# Altium PCB slave.PcbDoc (part 6 of 7)
Units mil, origin at the board's own origin, x right, y up, seen from the top; angles counter-clockwise.
Board outline 6299.21 x 3937.01 mil, 6 copper layers (Top Copper, FUSED_VBAT-, Signal Layer 2, Signal Layer 3, VREG, Bot Copper), stack 65.355 mil thick; 495 components, 307 nets, 1435 pads, 1866 vias.
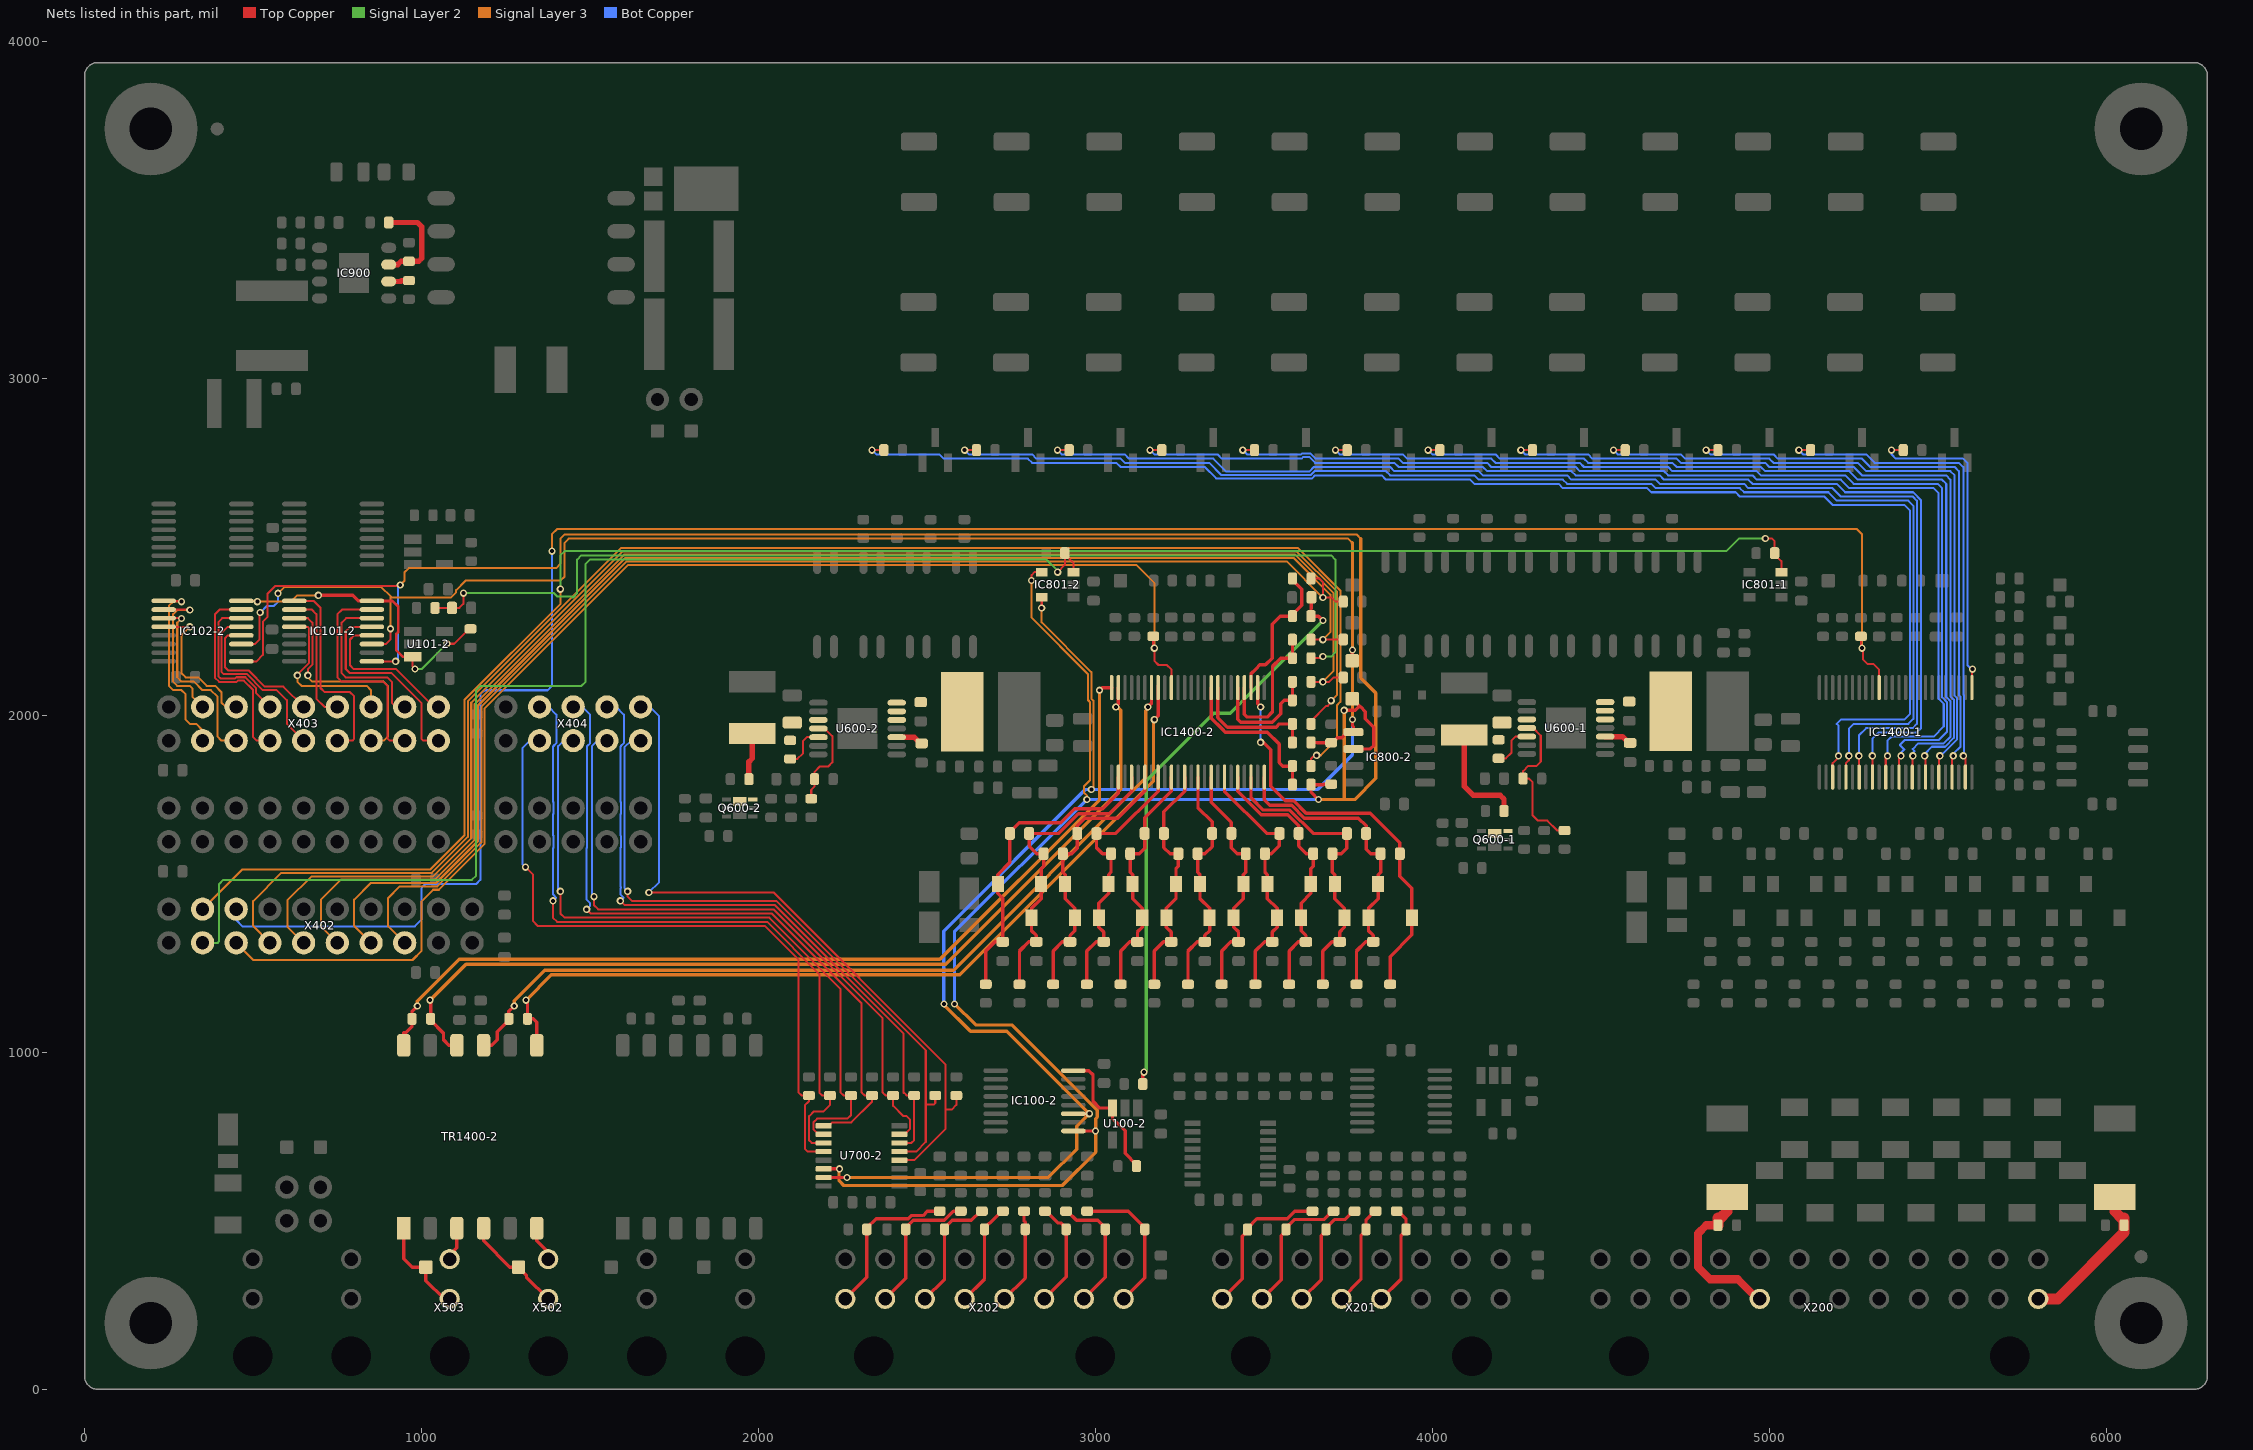
[diagram p9: the nets of this part, all layers, seen from the top]

## Via types
v1: diameter 21.65, hole 11.81, Top Copper to Bot Copper, tented both sides, 1848 vias
v2: diameter 35.43, hole 23.62, Top Copper to Bot Copper, 15 vias
v3: diameter 29.53, hole 19.68, Top Copper to Bot Copper, tented both sides, 3 vias

## Nets (pads, with @x,y where several pads share a name; then routed paths per layer and width w, separated by ;. In a path a pad name is that pad's centre, name@x,y a point inside that pad or via, vN(x,y) a via of type N, cw(c..) or ccw(c..) an arc to the next point about the centre after c; other vN are vias at no path point) (continued)
PRIMARY-T-SENSOR_3: R102-1.1 R111-1.2 X201.4 | length 304.4
  Top Copper w10: X201.4@3847.86,268.43 3906.25,326.82 3906.25,456 3921.31,471.06 R102-1.1@3921.31,475 3921.31,505.07 3897.69,528.69 R111-1.2@3893.75,528.69
PRIMARY-T-SENSOR_4: R105-1.1 R112-1.2 X201.5 | length 304.6
  Top Copper w10: X201.5@3729.82,268.43 3787.5,326.11 3787.5,456 3802.56,471.06 R105-1.1@3802.56,475 3802.56,503.94 3827.31,528.69 R112-1.2@3831.25,528.69
PRIMARY-T-SENSOR_5: R101-1.1 R113-1.2 X201.6 | length 345.9
  Top Copper w10: X201.6@3611.83,268.43 3669.22,325.82 3669.22,456.47 3683.81,471.06 R101-1.1@3683.81,475 3683.81,478.94 3708.81,503.94 3740.06,503.94 3764.81,528.69 R113-1.2@3768.75,528.69
PRIMARY-T-SENSOR_6: R104-1.1 R114-1.2 X201.7 | length 401.8
  Top Copper w10: X201.7@3493.84,268.43 3550.47,325.06 3550.47,456.47 3565.06,471.06 R104-1.1@3565.06,475 3565.06,478.94 3590.06,503.94 3677.56,503.94 3702.31,528.69 R114-1.2@3706.25,528.69
PRIMARY-T-SENSOR_7: R100-1.1 R115-1.2 X201.8 | length 454.6
  Top Copper w10: X201.8@3375.85,268.43 3434.97,327.55 3434.97,454.43 3450.91,470.37 R100-1.1@3450.91,474.31 3450.91,478.25 3478.91,506.25 3568.75,506.25 3591.19,528.69 R115-1.2@3643.75,528.69
PRIMARY-TEMP-ALERT: IC801-1.3 R801-1.1 X402.17 | length 5543.9
  Top Copper w6: v1(4987.5,2525) 5006.25,2525 5015.06,2516.19 R801-1.1@5015.06,2481.25 5015.06,2477.31 5034.74,2457.63 IC801-1.3@5034.74,2424.9
  Signal Layer 2 w6: v1(1411.71,2374.51) 1411.71,2474.51 1424.21,2487.01 4872.01,2487.01 4910,2525 v1(4987.5,2525)
  Signal Layer 3 w6: X402.17@350,1425 467.52,1542.52 1026.13,1542.52 1127.38,1643.77 1127.38,2045.85 1411.71,2330.18 v1(1411.71,2374.51)
PRIMARY-WDT: IC1400-1.39 R1401-1.1 X402.15 | length 6522.4
  Top Copper w6: R1401-1.1@5271.09,2234.45 5271.09,2202.63 v1(5274.21,2199.51) 5277.38,2196.34 5277.38,2165.47 5290.17,2152.68 5307.31,2152.68 5325,2135 IC1400-1.39@5325,2082.38
  Signal Layer 3 w6: v1(1386.71,2487.01) 1386.71,2537.01 1402.78,2553.08 5258.14,2553.08 5274.21,2537.01 v1(5274.21,2199.51)
  Bot Copper w6: X402.15@450,1425 449.21,1393.26 468.47,1374 979.95,1374 999.21,1393.26 999.21,1487.01 1011.71,1499.51 1161.71,1499.51 1174.21,1512.01 1174.21,2062.01 1186.71,2074.51 1374.21,2074.51 1386.71,2087.01 v1(1386.71,2487.01)
R_FB: IC900.6 R902.1 | length 61.1
  Top Copper w16: IC900.6@902.42,3287.5 938.22,3287.5 940.78,3290.06 R902.1@962.5,3290.06
R_REF: IC900.7 R903.2 R904.2 | length 302
  Top Copper w16: IC900.7@902.42,3337.5 928.92,3337.5 938.86,3347.44 R903.2@962.5,3347.44 991.63,3347.44 1000,3355.81 1000,3450 987.5,3462.5 R904.2@902.56,3462.5
RON_0: R603-1.1 U600-1.5 | length 132.1
  Top Copper w6: R603-1.1@4195.98,1872.41 4217.69,1872.41 4233.48,1888.19 4233.48,1924.97 4245.39,1936.88 U600-1.5@4279.83,1936.88
RON_1: R603-2.1 U600-2.5 | length 132.1
  Top Copper w6: R603-2.1@2093.65,1870.67 2115.37,1870.67 2131.15,1886.45 2131.15,1923.23 2143.06,1935.14 U600-2.5@2177.51,1935.14
S1: IC1400-1.25 R1530.2 | length 957
  Top Copper w6: v1(5361.71,2787.01) R1530.2@5394.69,2787.01 ; IC1400-1.25@5600.59,2082.38 5600.59,2135.26 v1(5602.34,2137.01)
  Bot Copper w6: v1(5361.71,2787.01) 5361.71,2774.51 5374.21,2762.01 5574.21,2762.01 5586.71,2749.51 5586.71,2149.51 5599.21,2137.01 v1(5602.34,2137.01)
S2: IC1400-1.23 R1525.2 | length 1465.9
  Top Copper w6: v1(5086.71,2787.01) R1525.2@5119.69,2787.01 ; v1(5575,1880) 5580.9,1874.1 IC1400-1.23@5580.9,1816.64
  Bot Copper w6: v1(5086.71,2787.01) 5099.21,2774.51 5286.71,2774.51 5311.71,2749.51 5561.71,2749.51 5575,2736.22 5575,2060.72 5576.83,2058.89 5576.83,1881.83 v1(5575,1880)
S3: IC1400-1.21 R1519.2 | length 1729.3
  Top Copper w6: v1(4811.71,2787.01) R1519.2@4844.69,2787.01 ; IC1400-1.21@5541.53,1816.64 5541.53,1876.53 v1(5545,1880)
  Bot Copper w6: v1(4811.71,2787.01) 4824.21,2774.51 5011.71,2774.51 5024.21,2762.01 5274.21,2762.01 5299.21,2737.01 5549.21,2737.01 5561.71,2724.51 5561.71,2059.87 5566.83,2054.75 5566.83,1907.69 5545,1885.87 v1(5545,1880)
S4: IC1400-1.19 R1513.2 | length 1999.6
  Top Copper w6: v1(4536.71,2787.01) R1513.2@4569.69,2787.01 ; IC1400-1.19@5502.16,1816.64 5502.16,1877.16 v1(5505,1880)
  Bot Copper w6: v1(4536.71,2787.01) 4549.21,2774.51 4736.71,2774.51 4749.21,2762.01 4999.21,2762.01 5011.71,2749.51 5261.71,2749.51 5286.71,2724.51 5536.71,2724.51 5549.21,2712.01 5549.21,2058.23 5556.83,2050.61 5556.83,1928.84 5514.99,1887.01 5511.71,1887.01 5505,1880.3 v1(5505,1880)
S5: IC1400-1.17 R1507.2 | length 2291.3
  Top Copper w6: v1(4261.71,2787.01) R1507.2@4294.69,2787.01 ; v1(5460,1880) 5462.79,1877.21 IC1400-1.17@5462.79,1816.64
  Bot Copper w6: v1(4261.71,2787.01) 4274.21,2774.51 4461.71,2774.51 4474.21,2762.01 4724.21,2762.01 4736.71,2749.51 4986.71,2749.51 4999.21,2737.01 5249.21,2737.01 5274.21,2712.01 5524.21,2712.01 5536.71,2699.51 5536.71,2056.58 5546.83,2046.47 5546.83,1932.98 5520.67,1906.83 5481.53,1906.83 5460,1885.3 v1(5460,1880)
S6: IC1400-1.15 R1501.2 | length 2583.2
  Top Copper w6: v1(3986.71,2787.01) R1501.2@4019.69,2787.01 ; IC1400-1.15@5423.42,1816.64 5423.42,1878.42 v1(5425,1880)
  Bot Copper w6: v1(3986.71,2787.01) 3999.21,2774.51 4186.71,2774.51 4199.21,2762.01 4449.21,2762.01 4461.71,2749.51 4711.71,2749.51 4724.21,2737.01 4974.21,2737.01 4986.71,2724.51 5236.71,2724.51 5261.71,2699.51 5511.71,2699.51 5524.21,2687.01 5524.21,2054.94 5536.83,2042.33 5536.83,1937.13 5516.53,1916.83 5441.53,1916.83 5424.21,1899.51 5430,1893.72 5425,1888.72 v1(5425,1880)
S7: IC1400-1.13 R1531.2 | length 2872.4
  Top Copper w6: v1(3711.71,2787.01) R1531.2@3744.69,2787.01 ; IC1400-1.13@5384.05,1816.64 5384.05,1874.05 v1(5390,1880)
  Bot Copper w6: v1(3711.71,2787.01) 3724.21,2774.51 3911.71,2774.51 3924.21,2762.01 4174.21,2762.01 4186.71,2749.51 4436.71,2749.51 4449.21,2737.01 4699.21,2737.01 4711.71,2724.51 4961.71,2724.51 4974.21,2712.01 5224.21,2712.01 5249.21,2687.01 5499.21,2687.01 5511.83,2674.39 5511.83,2053.18 5526.83,2038.18 5526.83,1952.13 5501.53,1926.83 5401.53,1926.83 5386.71,1912.01 5400,1898.72 5390,1888.72 v1(5390,1880)
S8: IC1400-1.11 R1524.2 | length 3147
  Top Copper w6: v1(3436.71,2787.01) R1524.2@3469.69,2787.01 ; IC1400-1.11@5344.68,1816.64 5344.68,1874.68 v1(5350,1880)
  Bot Copper w6: v1(3436.71,2787.01) 3449.21,2774.51 3609.5,2774.51 3611.82,2776.83 3638.18,2776.83 3653,2762.01 3899.21,2762.01 3911.71,2749.51 4161.71,2749.51 4174.21,2737.01 4424.21,2737.01 4436.71,2724.51 4686.71,2724.51 4699.21,2712.01 4949.21,2712.01 4961.71,2699.51 5211.71,2699.51 5236.71,2674.51 5486.71,2674.51 5501.83,2659.39 5501.83,2049.04 5516.83,2034.04 5516.83,1967.13 5486.71,1937.01 5361.71,1937.01 5349.21,1924.51 5350,1923.72 v1(5350,1880)
S9: IC1400-1.9 R1518.2 | length 3333.7
  Top Copper w6: v1(3161.71,2787.01) R1518.2@3194.69,2787.01 ; v1(5305,1880) 5305.31,1879.69 IC1400-1.9@5305.31,1816.64
  Bot Copper w6: v1(3161.71,2787.01) 3174.21,2774.51 3361.71,2774.51 3374.21,2762.01 3611.14,2762.01 3615.96,2766.83 3634.04,2766.83 3651.36,2749.51 3886.71,2749.51 3899.21,2737.01 4149.21,2737.01 4161.71,2724.51 4411.71,2724.51 4424.21,2712.01 4674.21,2712.01 4686.71,2699.51 4936.71,2699.51 4949.21,2687.01 5199.21,2687.01 5224.21,2662.01 5425.85,2662.01 5449.21,2638.65 5449.21,1962.01 5436.71,1949.51 5324.21,1949.51 5305,1930.3 v1(5305,1880)
S10: IC1400-1.7 R1512.2 | length 3629.1
  Top Copper w6: v1(2886.71,2787.01) R1512.2@2919.69,2787.01 ; v1(5265,1880) 5265.94,1879.06 IC1400-1.7@5265.94,1816.64
  Bot Copper w6: v1(2886.71,2787.01) 2899.21,2774.51 3086.71,2774.51 3099.21,2762.01 3349.21,2762.01 3388.05,2723.17 3634.04,2723.17 3647.88,2737.01 3874.21,2737.01 3886.71,2724.51 4136.71,2724.51 4149.21,2712.01 4399.21,2712.01 4411.71,2699.51 4661.71,2699.51 4674.21,2687.01 4924.21,2687.01 4936.71,2674.51 5186.71,2674.51 5211.71,2649.51 5424.21,2649.51 5436.83,2636.89 5436.83,1974.63 5424.21,1962.01 5286.71,1962.01 5265,1940.3 v1(5265,1880)
S11: IC1400-1.5 R1506.2 | length 3909.3
  Top Copper w6: v1(2611.71,2787.01) R1506.2@2644.69,2787.01 ; IC1400-1.5@5226.57,1816.64 5226.57,1858.04 5235,1866.47 v1(5235,1880)
  Bot Copper w6: v1(2611.71,2787.01) 2624.21,2774.51 2811.71,2774.51 2824.21,2762.01 3074.21,2762.01 3086.71,2749.51 3336.71,2749.51 3373.05,2713.17 3638.18,2713.17 3649.52,2724.51 3861.71,2724.51 3874.21,2712.01 4124.21,2712.01 4136.71,2699.51 4386.71,2699.51 4399.21,2687.01 4649.21,2687.01 4661.71,2674.51 4911.71,2674.51 4924.21,2662.01 5174.21,2662.01 5199.21,2637.01 5411.71,2637.01 5426.83,2621.89 5426.83,1989.63 5411.71,1974.51 5249.21,1974.51 5235,1960.3 v1(5235,1880)
S12: IC1400-1.3 R1500.2 | length 4194.8
  Top Copper w6: v1(2336.71,2787.01) R1500.2@2369.69,2787.01 ; IC1400-1.3@5187.2,1816.64 5187.2,1858.04 5204.73,1875.57 v1(5204.73,1880)
  Bot Copper w6: v1(2336.71,2787.01) 2349.21,2774.51 2536.71,2774.51 2549.21,2762.01 2799.21,2762.01 2811.71,2749.51 3061.71,2749.51 3074.21,2737.01 3324.21,2737.01 3358.05,2703.17 3642.33,2703.17 3651.16,2712.01 3849.21,2712.01 3861.71,2699.51 4111.71,2699.51 4124.21,2687.01 4374.21,2687.01 4386.71,2674.51 4636.71,2674.51 4649.21,2662.01 4899.21,2662.01 4911.71,2649.51 5161.71,2649.51 5186.71,2624.51 5399.21,2624.51 5416.83,2606.89 5416.83,2004.63 5399.21,1987.01 5211.71,1987.01 5199.21,1974.51 5204.73,1968.99 v1(5204.73,1880)
SECONDARY-ANALOG-IN_0: IC101-2.4 X403.1 | length 460.2
  Top Copper w6: IC101-2.4@852.66,2237.2 799.7,2237.2 787.5,2225 787.5,2148.72 799.21,2137.01 924.21,2137.01 1036.22,2025 X403.1@1049.99,2025
SECONDARY-ANALOG-IN_1: IC101-2.5 X403.2 | length 620.7
  Top Copper w6: IC101-2.5@852.66,2262.8 787.8,2262.8 775,2250 775,2137.5 787.5,2125 911.22,2125 999.21,2037.01 999.21,1930.79 1005,1925 X403.2@1049.99,1925
SECONDARY-ANALOG-IN_2: IC101-2.6 X403.3 | length 511.2
  Top Copper w6: IC101-2.6@852.66,2288.39 775.89,2288.39 762.5,2275 762.5,2125 775,2112.5 898.72,2112.5 911.71,2099.51 911.71,2037.01 923.72,2025 X403.3@950,2025
SECONDARY-ANALOG-IN_3: IC101-2.7 X403.4 | length 664
  Top Copper w6: IC101-2.7@851.5,2314 764,2314 750,2300 750,2112.5 762.5,2100 886.22,2100 899.21,2087.01 899.21,1930.79 905,1925 X403.4@950,1925
SECONDARY-ANALOG-IN_4: IC101-2.12 X403.5 | length 497.4
  Top Copper w6: IC101-2.12@622.34,2262.8 662.76,2262.8 665.76,2259.8 665.76,2154.68 631.25,2120.17 v1(631.25,2118.75)
  Signal Layer 3 w6: v1(631.25,2118.75) 631.25,2100 643.75,2087.5 836.71,2087.5 850,2074.21 X403.5@850,2025
SECONDARY-ANALOG-IN_5: IC101-2.11 X403.6 | length 680.5
  Top Copper w6: IC101-2.11@622.34,2288.39 662.76,2288.39 675.76,2275.39 675.76,2150.54 662.5,2137.28 v1(662.5,2118.75)
  Signal Layer 3 w6: v1(662.5,2118.75) 662.5,2112.5 675,2100 887.5,2100 900,2087.5 900,1937.01 887.99,1925 X403.6@850,1925
SECONDARY-ANALOG-IN_6: IC101-2.10 X403.7 | length 392.9
  Top Copper w6: IC101-2.10@623.5,2314 673.5,2314 687.5,2300 687.5,2049.51 712.01,2025 X403.7@750,2025
SECONDARY-ANALOG-IN_7: IC101-2.9 X403.8 | length 612.5
  Top Copper w6: IC101-2.9@622.34,2339.57 679.18,2339.57 700,2318.75 700,2081.25 712.5,2068.75 787.5,2068.75 800,2056.25 800,1930 795,1925 X403.8@750,1925
SECONDARY-ANALOG-IN_8: IC102-2.4 X403.9 | length 419.9
  Top Copper w6: IC102-2.4@465.16,2237.2 424.74,2237.2 416.71,2229.17 416.71,2143.29 426.92,2133.08 486.92,2133.08 535,2085 590,2085 X403.9@650,2025
SECONDARY-ANALOG-IN_9: IC102-2.5 X403.10 | length 550.9
  Top Copper w6: IC102-2.5@465.16,2262.8 424.74,2262.8 406.71,2244.77 406.71,2128.29 411.92,2123.08 481.08,2123.08 529.15,2075 570,2075 600,2045 600,1975 X403.10@650,1925
SECONDARY-ANALOG-IN_10: IC102-2.6 X403.11 | length 436.6
  Top Copper w6: IC102-2.6@465.16,2288.39 408.39,2288.39 396.71,2276.71 396.71,2116.15 403.35,2109.51 447,2109.51 450.57,2113.08 476.93,2113.08 509.21,2080.8 509.21,2065.79 X403.11@550,2025
SECONDARY-ANALOG-IN_11: IC102-2.7 X403.12 | length 596.1
  Top Copper w6: IC102-2.7@464,2314 401.5,2314 386.71,2299.21 386.71,2112.01 399.21,2099.51 451.14,2099.51 454.71,2103.08 472.79,2103.08 499.21,2076.66 499.21,1937.01 511.22,1925 X403.12@550,1925
SECONDARY-ANALOG-IN_12: IC102-2.12 X403.13 | length 447.9
  Top Copper w6: IC102-2.12@234.84,2262.8 312.2,2262.8 v1(312.5,2262.5)
  Signal Layer 3 w6: v1(312.5,2262.5) 287.5,2237.5 287.5,2125 300,2112.5 337.5,2112.5 362.5,2087.5 387.5,2087.5 406.25,2068.75 406.25,2037.5 418.75,2025 X403.13@450,2025
SECONDARY-ANALOG-IN_13: IC102-2.11 X403.14 | length 555.4
  Top Copper w6: IC102-2.11@234.84,2288.39 286.61,2288.39 v1(287.5,2287.5)
  Signal Layer 3 w6: v1(287.5,2287.5) 275,2275 275,2112.5 287.5,2100 325,2100 350,2075 375,2075 393.75,2056.25 393.75,1937.5 406.25,1925 X403.14@450,1925
SECONDARY-ANALOG-IN_14: IC102-2.10 X403.15 | length 466.7
  Top Copper w6: IC102-2.10@234.84,2313.98 311.02,2313.98 v1(312.5,2312.5)
  Signal Layer 3 w6: v1(312.5,2312.5) 275,2312.5 262.5,2300 262.5,2100 275,2087.5 312.5,2087.5 320,2080 320,2055 X403.15@350,2025
SECONDARY-ANALOG-IN_15: IC102-2.9 X403.16 | length 563.2
  Top Copper w6: IC102-2.9@234.84,2339.57 285.43,2339.57 v1(287.5,2337.5)
  Signal Layer 3 w6: v1(287.5,2337.5) 262.5,2337.5 250,2325 250,2087.5 262.5,2075 287.5,2075 300,2062.5 300,1987.5 312.5,1975 331.25,1975 350,1956.25 X403.16@350,1925
SECONDARY-C0: C1322-2.2 IC1400-2.26 R1312-2.2 Z1310-2.2 | length 1226.9
  Top Copper w10: IC1400-2.26@3480.9,2082.38 3480.9,2034.1 v1(3490,2025) ; v1(3490,1920) 3497.47,1920 3520,1897.47 3520,1790 3563,1747 3587.36,1747 3624.36,1710 3815,1710 3902.75,1622.25 C1322-2.2@3902.75,1589.51 3902.75,1522.25 3938.58,1486.42 Z1310-2.2@3938.58,1399.51 3938.58,1348.58 3874.21,1284.21 R1312-2.2@3874.21,1202.07
  Bot Copper w6: v1(3490,1920) v1(3490,2025)
SECONDARY-C1: C1318-2.2 C1320-2.1 C1322-2.1 IC1400-2.24 R1310-2.2 Z1308-2.2 Z1310-2.1 | length 961.5
  Top Copper w10: IC1400-2.24@3500.59,1816.64 3500.59,1749.41 3517,1733 3581.56,1733 3619.56,1695 3779.96,1695 3802.75,1672.21 C1318-2.2@3802.75,1649.51 3802.75,1602.75 3816,1589.51 C1322-2.1@3845.67,1589.51 3845.67,1534.61 3838.58,1527.53 Z1308-2.2@3838.58,1499.51 3838.58,1456.27 3809.84,1427.53 Z1310-2.1@3809.84,1399.51 3809.84,1361.19 3824.21,1346.82 C1320-2.1@3824.21,1328.05 3801.51,1328.05 3774.21,1300.75 R1310-2.2@3774.21,1202.07
SECONDARY-C2: C1314-2.2 C1316-2.1 C1318-2.1 IC1400-2.22 R1308-2.2 Z1306-2.2 Z1308-2.1 | length 910.1
  Top Copper w10: IC1400-2.22@3461.22,1816.64 3461.22,1755.66 3497.88,1719 3575.76,1719 3645.25,1649.51 C1318-2.1@3745.67,1649.51 3745.67,1605.67 3729.51,1589.51 C1314-2.2@3702.75,1589.51 ; R1308-2.2@3674.21,1202.07 3674.21,1300.75 3701.51,1328.05 C1316-2.1@3724.21,1328.05 3724.21,1357.12 3738.58,1371.49 Z1306-2.2@3738.58,1399.51 3738.58,1427.53 3709.84,1456.27 Z1308-2.1@3709.84,1499.51 3709.84,1527.53 3702.75,1534.61 C1314-2.2@3702.75,1574.51
SECONDARY-C3: C1310-2.2 C1312-2.1 C1314-2.1 IC1400-2.20 R1306-2.2 Z1304-2.2 Z1306-2.1 | length 804.5
  Top Copper w10: IC1400-2.20@3421.85,1816.64 3421.85,1775.23 3492.08,1705 3569.96,1705 3602.75,1672.21 C1310-2.2@3602.75,1649.51 3602.75,1612.25 3625.49,1589.51 C1314-2.1@3645.67,1589.51 ; R1306-2.2@3574.21,1202.07 3574.21,1300.75 3601.51,1328.05 C1312-2.1@3624.21,1328.05 3624.21,1346.82 3609.84,1361.19 Z1306-2.1@3609.84,1399.51 3609.84,1442.75 3638.58,1471.49 Z1304-2.2@3638.58,1499.51 3638.58,1544.72 3645.67,1551.81 C1314-2.1@3645.67,1574.51
SECONDARY-C4: C1306-2.2 C1308-2.1 C1310-2.1 IC1400-2.18 R1304-2.2 Z1302-2.2 Z1304-2.1 | length 772.7
  Top Copper w10: IC1400-2.18@3382.48,1816.64 3382.48,1775.23 3508.2,1649.51 C1310-2.1@3545.67,1649.51 3545.67,1626.81 3545,1626.14 3545,1612.99 3521.52,1589.51 C1306-2.2@3502.75,1589.51 ; R1304-2.2@3474.21,1202.07 3474.21,1300.75 3501.51,1328.05 C1308-2.1@3524.21,1328.05 3524.21,1357.12 3538.58,1371.49 Z1302-2.2@3538.58,1399.51 3538.58,1427.53 3509.84,1456.27 Z1304-2.1@3509.84,1499.51 3509.84,1527.53 3502.75,1534.61 C1306-2.2@3502.75,1574.51
SECONDARY-C5: C1302-2.2 C1304-2.1 C1306-2.1 IC1400-2.16 R1302-2.2 Z1300-2.2 Z1302-2.1 | length 711.6
  Top Copper w10: IC1400-2.16@3343.11,1816.64 3343.11,1741.89 3402.75,1682.25 C1302-2.2@3402.75,1649.51 3402.75,1607.25 3420.49,1589.51 C1306-2.1@3445.67,1589.51 ; R1302-2.2@3374.21,1202.07 3374.21,1300.75 3401.51,1328.05 C1304-2.1@3424.21,1328.05 3424.21,1357.12 3409.84,1371.49 Z1302-2.1@3409.84,1399.51 3409.84,1427.53 3438.58,1456.27 Z1300-2.2@3438.58,1499.51 3438.58,1527.53 3445.67,1534.61 C1306-2.1@3445.67,1574.51
SECONDARY-C6: C1300-2.1 C1302-2.1 C1323-2.2 IC1400-2.14 R1300-2.2 Z1300-2.1 Z1311-2.2 | length 702.3
  Top Copper w10: R1300-2.2@3274.21,1202.07 3274.21,1300.75 3301.51,1328.05 C1300-2.1@3324.21,1328.05 3324.21,1346.82 3338.58,1361.19 Z1311-2.2@3338.58,1399.51 3338.58,1427.53 3309.84,1456.27 Z1300-2.1@3309.84,1499.51 3309.84,1527.53 3302.75,1534.61 C1323-2.2@3302.75,1574.51 ; C1323-2.2@3302.75,1589.51 3324.51,1589.51 3345.67,1610.67 C1302-2.1@3345.67,1649.51 3345.67,1684.33 3303.74,1726.26 IC1400-2.14@3303.74,1816.64
SECONDARY-C7: C1319-2.2 C1321-2.1 C1323-2.1 IC1400-2.12 R1311-2.2 Z1309-2.2 Z1311-2.1 | length 712.1
  Top Copper w10: R1311-2.2@3174.21,1202.07 3174.21,1300.75 3201.51,1328.05 C1321-2.1@3224.21,1328.05 3224.21,1357.12 3209.84,1371.49 Z1311-2.1@3209.84,1399.51 3209.84,1427.53 3238.58,1456.27 Z1309-2.2@3238.58,1499.51 3238.58,1544.72 3245.67,1551.81 C1323-2.1@3245.67,1574.51 ; C1323-2.1@3245.67,1589.51 3221,1589.51 3202.75,1607.75 C1319-2.2@3202.75,1649.51 3202.75,1713.62 3264.37,1775.23 IC1400-2.12@3264.37,1816.64
SECONDARY-C8: C1315-2.2 C1317-2.1 C1319-2.1 IC1400-2.10 R1309-2.2 Z1307-2.2 Z1309-2.1 | length 720.7
  Top Copper w10: R1309-2.2@3074.21,1202.07 3074.21,1300.75 3101.51,1328.05 C1317-2.1@3124.21,1328.05 3124.21,1357.12 3138.58,1371.49 Z1307-2.2@3138.58,1399.51 3138.58,1427.53 3109.84,1456.27 Z1309-2.1@3109.84,1499.51 3109.84,1527.53 3102.75,1534.61 C1315-2.2@3102.75,1574.51 ; C1315-2.2@3102.75,1589.51 3129.51,1589.51 3145.67,1605.67 C1319-2.1@3145.67,1649.51 3145.67,1695.9 3225,1775.23 IC1400-2.10@3225,1816.64
SECONDARY-C9: C1311-2.2 C1313-2.1 C1315-2.1 IC1400-2.8 R1307-2.2 Z1305-2.2 Z1307-2.1 | length 796.1
  Top Copper w10: R1307-2.2@2974.21,1202.07 2974.21,1300.75 3001.51,1328.05 C1313-2.1@3024.21,1328.05 3024.21,1357.12 3009.84,1371.49 Z1307-2.1@3009.84,1399.51 3009.84,1442.75 3038.58,1471.49 Z1305-2.2@3038.58,1499.51 3038.58,1527.53 3045.67,1534.61 C1315-2.1@3045.67,1574.51 ; C1315-2.1@3045.67,1589.51 3020.49,1589.51 3002.75,1607.25 C1311-2.2@3002.75,1649.51 3059.9,1649.51 3185.63,1775.23 IC1400-2.8@3185.63,1816.64
SECONDARY-C10: C1307-2.2 C1309-2.1 C1311-2.1 IC1400-2.6 R1305-2.2 Z1303-2.2 Z1305-2.1 | length 828.1
  Top Copper w10: R1305-2.2@2874.21,1202.07 2874.21,1300.75 2901.51,1328.05 C1309-2.1@2924.21,1328.05 2924.21,1346.82 2938.58,1361.19 Z1303-2.2@2938.58,1399.51 2938.58,1427.53 2909.84,1456.27 Z1305-2.1@2909.84,1499.51 2909.84,1527.53 2902.75,1534.61 C1307-2.2@2902.75,1574.51 ; C1307-2.2@2902.75,1589.51 2929.51,1589.51 2945.67,1605.67 C1311-2.1@2945.67,1649.51 2945.67,1672.21 2967.97,1694.51 3065.53,1694.51 3146.26,1775.23 IC1400-2.6@3146.26,1816.64
SECONDARY-C11: C1303-2.2 C1305-2.1 C1307-2.1 IC1400-2.4 R1303-2.2 Z1301-2.2 Z1303-2.1 | length 914.4
  Top Copper w10: R1303-2.2@2774.21,1202.07 2774.21,1300.75 2801.51,1328.05 C1305-2.1@2824.21,1328.05 2824.21,1346.82 2809.84,1361.19 Z1303-2.1@2809.84,1399.51 2809.84,1427.53 2838.58,1456.27 Z1301-2.2@2838.58,1499.51 2838.58,1544.72 2845.67,1551.81 C1307-2.1@2845.67,1574.51 ; C1307-2.1@2845.67,1589.51 2825.49,1589.51 2802.75,1612.25 C1303-2.2@2802.75,1649.51 2890.26,1649.51 2949.26,1708.51 3040.16,1708.51 3106.89,1775.23 IC1400-2.4@3106.89,1816.64
SECONDARY-C12: C1301-2.1 C1303-2.1 IC1400-2.2 R1301-2.2 Z1301-2.1 | length 908.6
  Top Copper w10: R1301-2.2@2674.21,1202.07 2674.21,1300.75 2701.51,1328.05 C1301-2.1@2724.21,1328.05 2724.21,1457.12 2709.84,1471.49 Z1301-2.1@2709.84,1499.51 2709.84,1527.53 2745.67,1563.35 C1303-2.1@2745.67,1634.29 ; C1303-2.1@2745.67,1649.51 2745.67,1653.45 2773.47,1681.25 2896.92,1681.25 2938.18,1722.51 3021.55,1722.51 3067.52,1768.48 IC1400-2.2@3067.52,1816.64
SECONDARY-DIGITAL-IO_0: R700-2.1 U700-2.4 X404.1 | length 2130.4
  Top Copper w6: v1(1674.21,1474.51) 2044.24,1474.51 2555,963.75 2555,830 ; U700-2.4@2417.66,679.96 2462.27,679.96 2555,772.69 2555,830 ; R700-2.1@2582.77,871.95 R700-2.1@2586.71,871.95 2586.71,843.94 2572.77,830 2555,830
  Bot Copper w6: X404.1@1650,2025 1676.85,2025 1705,1996.85 1705,1505.28 v1(1674.21,1474.51)
SECONDARY-DIGITAL-IO_1: R701-2.1 U700-2.5 X404.2 | length 1991.9
  Top Copper w6: v1(1611.71,1477.63) 1611.71,1462.01 1624.21,1449.51 2052.71,1449.51 2496.07,1006.15 2496.07,845 ; U700-2.5@2417.66,705.55 2467.26,705.55 2496.07,734.36 2496.07,845 ; R701-2.1@2524.21,871.95 2524.21,849.21 2520,845 2496.07,845
  Bot Copper w6: v1(1611.71,1477.63) 1603.36,1486.01 1601.45,1487.92 1601.45,1904.87 1621.58,1925 X404.2@1650,1925
SECONDARY-DIGITAL-IO_2: R702-2.1 U700-2.6 X404.3 | length 2021.7
  Top Copper w6: v1(1589.84,1449.51) 1602.34,1437.01 2048.61,1437.01 2430.46,1055.16 2430.46,879.54 2432.4,879.54 2439.99,871.95 R702-2.1@2461.71,871.95 2461.71,739.17 2453.69,731.14 U700-2.6@2417.66,731.14
  Bot Copper w6: X404.3@1550,2025 1576.85,2025 1600,2001.85 1600,1917.56 1591.45,1909.01 1591.45,1907.83 1590,1906.38 1590,1743.62 1591.45,1742.17 1591.45,1707.83 1590,1706.38 1590,1643.62 1591.45,1642.17 1591.45,1607.83 1590,1606.38 1590,1492.33 1591.35,1490.98 1591.35,1488.14 1589.88,1486.67 1589.88,1468.59 1599.4,1459.07 v1(1589.84,1449.51)
SECONDARY-DIGITAL-IO_3: R703-2.1 U700-2.7 X404.4 | length 1940.9
  Top Copper w6: v1(1511.71,1462.01) 1511.71,1437.01 1524.21,1424.51 2044.24,1424.51 2367.96,1100.79 2367.96,880.76 2368.68,880.76 2377.49,871.95 R703-2.1@2399.21,871.95 2399.21,841.32 2430,810.53 2439.47,810.53 2450,800 2450,773.32 2433.41,756.73 U700-2.7@2417.66,756.73
  Bot Copper w6: v1(1511.71,1462.01) 1505,1468.72 1505,1908.42 1521.58,1925 X404.4@1550,1925
SECONDARY-DIGITAL-IO_4: R704-2.1 U700-2.9 X404.5 | length 2071.2
  Top Copper w6: v1(1489.84,1424.51) 1502.34,1412.01 2038.74,1412.01 2305.46,1145.29 2305.46,880.76 2306.18,880.76 2314.99,871.95 R704-2.1@2336.71,871.95 2336.71,854.17 2274.99,792.45 2219.13,792.45 2209,782.32 U700-2.9@2193.26,782.32
  Bot Copper w6: X404.5@1450,2025 1476.85,2025 1500,2001.85 1500,1917.56 1491.45,1909.01 1491.45,1607.83 1489.88,1606.27 1489.88,1452.97 1500,1442.85 1500,1434.67 v1(1489.84,1424.51)
SECONDARY-DIGITAL-IO_5: R705-2.1 U700-2.10 X404.6 | length 2053.5
  Top Copper w6: v1(1411.71,1477.63) 1411.71,1412.01 1424.21,1399.51 2031.74,1399.51 2242.96,1188.29 2242.96,880.76 2243.68,880.76 2252.49,871.95 R705-2.1@2274.21,871.95 2274.21,813.72 2263.64,803.15 2173.84,803.15 2162.5,791.81 2162.5,771.74 2177.51,756.73 U700-2.10@2193.26,756.73
  Bot Copper w6: v1(1411.71,1477.63) 1405,1484.36 1405,1908.42 1421.58,1925 X404.6@1450,1925
SECONDARY-DIGITAL-IO_6: R706-2.1 U700-2.11 X404.7 | length 2145
  Top Copper w6: v1(1389.84,1449.51) 1389.84,1399.51 1402.34,1387.01 2025.49,1387.01 2180.46,1232.04 2180.46,880.76 2189.27,871.95 R706-2.1@2211.71,871.95 2211.71,843.45 2193.26,825 2164.47,825 2150,810.53 2150,738.39 2157.24,731.14 U700-2.11@2193.26,731.14
  Bot Copper w6: X404.7@1350,2025 1376.85,2025 1400,2001.85 1400,1917.56 1391.45,1909.01 1391.45,1907.83 1389.88,1906.27 1389.88,1743.73 1391.45,1742.17 1391.45,1707.83 1389.88,1706.27 1389.88,1643.73 1391.45,1642.17 1391.45,1607.83 1389.88,1606.27 1389.88,1468.59 1399.4,1459.07 v1(1389.84,1449.51)
SECONDARY-DIGITAL-IO_7: R707-2.1 U700-2.12 X404.8 | length 2072.2
  Top Copper w6: v1(1308.59,1549.51) 1330,1528.1 1330,1390 1345.49,1374.51 2019.24,1374.51 2117.96,1275.79 2117.96,880.76 2118.68,880.76 2127.49,871.95 R707-2.1@2149.21,871.95 2149.21,854.17 2137.5,842.46 2137.5,713.71 2145.66,705.55 U700-2.12@2193.26,705.55
  Bot Copper w6: v1(1308.59,1549.51) 1300,1558.1 1300,1903.42 1321.58,1925 X404.8@1350,1925
SECONDARY-GPIO1: IC1400-2.27 R1405-2.2 R1407-2.2 | length 428.7
  Top Copper w10: IC1400-2.27@3461.22,2082.38 3461.22,2123.79 3476.22,2138.78 3487.43,2150 3504.17,2150 3523.83,2169.66 3523.83,2189.87 3523.71,2189.99 3523.71,2270.21 3548.01,2294.51 R1407-2.2@3584.15,2294.51 3584.15,2298.45 3611.83,2326.13 3611.83,2374.75 3584.27,2402.31 R1405-2.2@3584.27,2406.25
SECONDARY-GPIO1-OPT: R1404-2.1 R1405-2.1 X402.6 | length 3771.4
  Top Copper w6: R1405-2.1@3639.39,2406.25 3663.88,2406.25 3674.21,2395.92 v1(3674.21,2349.51) 3700.49,2349.51 3712.5,2337.5 R1404-2.1@3734.94,2337.5
  Signal Layer 3 w6: X402.6@950,1325 901,1374 901,1458 935.52,1492.52 1046.84,1492.52 1177.38,1623.06 1177.38,2025.14 1609.07,2456.83 3566.89,2456.83 v1(3674.21,2349.51)
SECONDARY-GPIO2: IC1400-2.28 R1409-2.2 R1410-2.2 | length 431.4
  Top Copper w10: IC1400-2.28@3441.53,2082.38 3441.53,2003.47 3450,1995 3510,1995 3525,2010 3525,2145 3549.51,2169.51 R1410-2.2@3584.15,2169.51 R1409-2.2@3584.15,2224.51
SECONDARY-GPIO2-OPT: R1408-2.1 R1409-2.1 X402.8 | length 3982.5
  Top Copper w6: R1409-2.1@3641.24,2224.51 v1(3674.21,2224.51) 3674.7,2225 R1408-2.1@3734.94,2225
  Signal Layer 3 w6: X402.8@850,1325 800,1375 800,1453 849.52,1502.52 1042.7,1502.52 1167.38,1627.2 1167.38,2029.28 1604.93,2466.83 3587.76,2466.83 3696.53,2358.06 3696.53,2246.83 v1(3674.21,2224.51)
SECONDARY-GPIO3: IC1400-2.29 R1412-2.2 R1413-2.2 | length 360
  Top Copper w10: IC1400-2.29@3421.85,2082.38 3421.85,1988.15 3431,1979 3524,1979 3550,2005 3550,2035 3559.51,2044.51 R1413-2.2@3584.15,2044.51 R1412-2.2@3584.15,2099.51
SECONDARY-GPIO3-OPT: R1411-2.1 R1412-2.1 X402.10 | length 4235.3
  Top Copper w6: R1412-2.1@3641.24,2099.51 v1(3674.21,2099.51) 3693.26,2099.51 3706.25,2112.5 R1411-2.1@3734.94,2112.5
  Signal Layer 3 w6: X402.10@750,1325 702,1373 702,1454 760.52,1512.52 1038.56,1512.52 1157.38,1631.34 1157.38,2033.42 1600.78,2476.83 3591.9,2476.83 3706.53,2362.2 3706.53,2131.83 v1(3674.21,2099.51)
SECONDARY-GPIO4: IC1400-2.32 R1414-2.2 R1417-2.2 | length 381
  Top Copper w10: IC1400-2.32@3362.79,2082.38 3362.79,1993.49 3391.29,1965 3535.98,1965 3545.49,1974.51 R1414-2.2@3584.15,1974.51 R1417-2.2@3584.15,1919.51
SECONDARY-GPIO4-OPT: R1414-2.1 X402.12 | length 4401.2
  Top Copper w6: R1414-2.1@3639.27,1974.51 3639.27,1978.45 3639.27,1982.64 3684.71,2028.08 3688.9,2028.08 3699.21,2038.39 v1(3699.21,2043.75)
  Signal Layer 3 w6: X402.12@650,1325 602,1373 602,1451 673.52,1522.52 1034.41,1522.52 1147.38,1635.48 1147.38,2037.56 1596.64,2486.83 3596.05,2486.83 3716.53,2366.35 3716.53,2061.07 v1(3699.21,2043.75)
SECONDARY-GPIO5: IC1400-2.33 R1418-2.2 R1419-2.2 | length 477.7
  Top Copper w10: IC1400-2.33@3343.11,2082.38 3343.11,1991.89 3375.5,1959.5 3385,1950 3510,1950 3545,1915 3545,1860 3555.49,1849.51 R1418-2.2@3584.15,1849.51 R1419-2.2@3584.15,1794.51
SECONDARY-GPIO5-OPT: R1418-2.1 X402.14 | length 4661.5
  Top Copper w6: R1418-2.1@3639.27,1849.51 3639.27,1871.23 3649.29,1881.25 v1(3656.25,1881.25)
  Signal Layer 3 w6: X402.14@550,1325 500,1375 500,1449 583.52,1532.52 1030.27,1532.52 1137.38,1639.62 1137.38,2041.7 1592.5,2496.83 3600.19,2496.83 3726.53,2370.49 3726.53,2040.2 3715.67,2029.35 3715.67,1928.47 3668.45,1881.25 v1(3656.25,1881.25)
SECONDARY-IN+: TP1407-2.1 TR1400-2.4 X502.1 | length 304.3
  Top Copper w10: TR1400-2.4@1183.9,478.35 1183.9,440.6 1262,362.5 TP1407-2.1@1287.5,362.5 1311.18,338.82 1311.18,332.85 X502.1@1375.6,268.43
SECONDARY-IN-: TR1400-2.6 X502.2 | length 105.9
  Top Copper w10: TR1400-2.6@1341.9,478.35 1341.9,440.6 1375.6,406.89 X502.2@1375.6,386.42
SECONDARY-IN_N1: IC1400-2.41 R1422-2.2 TR1400-2.7 | length 2578.2
  Top Copper w10: v1(1310,1155) 1314.27,1150.73 R1422-2.2@1314.27,1099.51 1332.05,1099.51 1341.9,1089.66 TR1400-2.7@1341.9,1020.85 ; v1(3174.21,1987.01) 3185.63,1998.43 IC1400-2.41@3185.63,2088.68
  Signal Layer 3 w10: v1(1310,1155) 1384.75,1229.75 2596.45,1229.75 3171.71,1805.01 3171.71,1984.51 v1(3174.21,1987.01)
SECONDARY-IN_P1: IC1400-2.42 R1422-2.1 TR1400-2.9 | length 2607.4
  Top Copper w10: TR1400-2.9@1183.9,1020.85 1207.9,1020.85 1225,1037.95 1225,1061.42 1259.15,1095.57 R1422-2.1@1259.15,1099.51 1259.15,1121.65 v1(1275,1137.5) ; v1(3155,2025) 3165.94,2035.94 IC1400-2.42@3165.94,2082.38
  Signal Layer 3 w10: v1(1275,1137.5) 1275,1153.7 1365.05,1243.75 2578.45,1243.75 3149.21,1814.51 3149.21,2013.93 3155,2019.72 v1(3155,2025)
SECONDARY-MUX-DATA_TEMP: C111-2.2 R116-2.2 R1407-2.1 | length 1722.4
  Top Copper w10: R116-2.2@3140.06,906.25 3140.06,937.42 v1(3143.75,941.11) ; C111-2.2@3640.38,2350 3640.38,2317.33 3639.27,2316.23 R1407-2.1@3639.27,2294.51 3661.44,2294.51 v1(3674.7,2281.25)
  Signal Layer 2 w10: v1(3143.75,941.11) 3150,947.36 3150,1806.25 3350.05,2006.3 3399.75,2006.3 v1(3674.7,2281.25)
SECONDARY-MUX-DATA_USER: C115-2.2 R118-2.2 R1410-2.1 | length 3186.9
  Top Copper w6: R118-2.2@1037.56,2325 1043.81,2318.75 C115-2.2@1090.21,2318.75 1111.94,2318.75 1124.21,2331.02 v1(1124.21,2362.5) ; R1410-2.1@3641.24,2169.51 3669.21,2169.51 v1(3674.21,2174.51)
  Signal Layer 2 w6: v1(1124.21,2362.5) 1392.85,2362.5 1402.67,2352.68 1446.04,2352.68 1449.21,2349.51 1461.71,2362.01 1461.71,2462.01 1474.21,2474.51 3699.21,2474.51 3711.71,2462.01 3711.71,2187.01 3699.21,2174.51 v1(3674.21,2174.51)
SECONDARY-OPA_TEMP: IC100-2.8 R117-2.1 U100-2.3 | length 409.9
  Top Copper w10: IC100-2.8@2933.91,945.82 2980.17,945.82 2992.3,933.69 2992.3,855.27 3012.83,834.74 U100-2.3@3050.1,834.74 3050.1,805.15 3087.5,767.75 3087.5,700.25 3121.31,666.44 R117-2.1@3121.31,662.5
SECONDARY-OPA_USER: IC101-2.8 IC102-2.8 R119-2.1 U101-2.3 | length 929.9
  Top Copper w6: IC102-2.8@465.16,2339.57 510.43,2339.57 v1(512.5,2337.5) ; U101-2.3@973.42,2174.21 973.42,2144.75 v1(980.67,2137.5) ; v1(1075,2212.5) 1096.83,2212.5 1141.06,2256.73 R119-2.1@1145,2256.73
  Top Copper w8: IC101-2.8@823.13,2339.57 IC101-2.8@852.66,2339.57 913.86,2339.57 930.83,2322.6 930.83,2247.54 925,2241.72 925,2193.04 943.83,2174.21 U101-2.3@973.42,2174.21
  Top Copper w10: v1(693.75,2356.25) 795.56,2356.25 812.24,2339.57 IC101-2.8@823.13,2339.57
  Signal Layer 2 w6: v1(980.67,2137.5) 1000,2137.5 v1(1075,2212.5)
  Signal Layer 3 w6: v1(512.5,2337.5) 612.5,2337.5 631.25,2356.25 v1(693.75,2356.25)
SECONDARY-OUT+: TP1406-2.1 TR1400-2.1 X503.1 | length 299.7
  Top Copper w10: TR1400-2.1@946.9,478.35 946.9,388.1 972.5,362.5 TP1406-2.1@1012.5,362.5 1012.5,322.5 1066.57,268.43 X503.1@1083.34,268.43
SECONDARY-OUT-: TR1400-2.3 X503.2 | length 100.9
  Top Copper w10: X503.2@1083.34,386.42 1083.34,398.34 1104.9,419.9 TR1400-2.3@1104.9,478.35
SECONDARY-OUT_N1: IC1400-2.47 R1423-2.2 TR1400-2.10 | length 2810.6
  Top Copper w10: v1(1025,1155) 1026.77,1153.23 R1423-2.2@1026.77,1099.51 1026.77,1095.57 1065,1057.34 1065,1036.75 1080.9,1020.85 TR1400-2.10@1104.9,1020.85 ; v1(3060,2025) 3067.52,2032.52 IC1400-2.47@3067.52,2082.38
  Signal Layer 3 w10: v1(1025,1155) 1131.79,1261.79 2555.54,1261.79 3075,1781.25 3075,2014.72 3060,2029.72 v1(3060,2025)
SECONDARY-OUT_P1: IC1400-2.48 R1423-2.1 TR1400-2.12 | length 2787
  Top Copper w10: TR1400-2.12@946.9,1020.85 946.9,1058.6 952.45,1058.6 971.65,1077.79 R1423-2.1@971.65,1099.51 971.65,1121.65 v1(987.5,1137.5) ; v1(3011.71,2074.51) 3019.58,2082.38 IC1400-2.48@3047.83,2082.38
  Signal Layer 3 w10: v1(987.5,1137.5) 987.5,1151.2 1112.09,1275.79 2538.29,1275.79 3011.71,1749.21 v1(3011.71,2074.51)
SECONDARY-SCL_1: IC100-2.1 IC101-2.1 IC102-2.1 IC800-2.6 IC801-2.4 R1416-2.1 R1419-2.1 TP1405-2.1 U700-2.14 | length 9406
  Top Copper w6: IC102-2.1@465.16,2160.43 510.43,2160.43 529.3,2179.3 529.3,2278.3 543,2292 543,2361.67 565.17,2383.84 933.54,2383.84 v1(936.71,2387.01) ; IC101-2.1@852.66,2160.43 v1(922.93,2160.43) ; v1(2810,2400) 2810,2416.36 2818.54,2424.9 IC801-2.4@2840.26,2424.9
  Top Copper w10: U700-2.14@2193.26,654.37 v1(2240,654.37) ; IC100-2.1@2933.91,766.68 v1(3000,766.68) ; v1(3661.27,1750.15) 3639.27,1772.15 R1419-2.1@3639.27,1794.51 3676.33,1794.51 3677.49,1795.67 R1416-2.1@3699.21,1795.67 ; v1(3737.5,2014.72) 3771.05,2014.72 3781.33,2025 ; TP1405-2.1@3761.71,2049.51 3783.78,2027.44 3781.33,2025 ; IC800-2.6@3765.27,1900.25 3814.98,1900.25 3825,1910.27 3825,1965 3800,1990 3800,2011.22 3786.22,2025 3781.33,2025
  Signal Layer 3 w6: v1(936.71,2387.01) 949.21,2399.51 949.21,2424.51 961.71,2437.01 1399.21,2437.01 1411.71,2449.51 1411.71,2524.51 1424.21,2537.01 3774.21,2537.01 3786.71,2524.51 ; v1(2810,2400) 2810,2290 2977.5,2122.5 2977.5,2045.54 2983.54,2039.5 2983.54,1806.9 2965.67,1789.04 2965.67,1770.96 2973.92,1762.71 v1(2973.92,1750.15)
  Signal Layer 3 w10: v1(2240,654.37) 2238.67,653.04 2238.67,618.91 2252.63,604.95 2900.72,604.95 3000,704.23 v1(3000,766.68) 3000,802.92 3005.08,807.99 3005.08,827.73 2751.56,1081.25 2643.75,1081.25 v1(2581.25,1143.75) ; v1(3661.27,1750.15) 3737.5,1750.15 ; v1(3737.5,2014.72) 3737.5,1750.15 ; 3786.71,2524.51 3786.71,2110.84 3831.25,2066.3 3831.25,1812.8 3768.6,1750.15 3737.5,1750.15
  Bot Copper w6: v1(922.93,2160.43) 929.83,2167.33 929.83,2380.13 v1(936.71,2387.01)
  Bot Copper w10: v1(2581.25,1143.75) 2581.25,1357.48 v1(2973.92,1750.15) v1(3661.27,1750.15)
SECONDARY-SDA_1: IC100-2.3 IC101-2.3 IC102-2.3 IC800-2.5 IC801-2.5 R1415-2.1 R1417-2.1 TP1404-2.1 U700-2.15 | length 8416.7
  Top Copper w6: IC102-2.3@465.16,2211.61 505.57,2211.61 519.3,2225.34 519.3,2303.3 v1(521,2305) ; IC101-2.3@852.66,2211.61 893.82,2211.61 908,2225.79 v1(908,2257) v1@903.17,2252.17 ; v1(2840,2318.75) 2840.26,2319.01 IC801-2.5@2840.26,2350.1
  Top Copper w10: U700-2.15@2193.26,628.78 v1(2262.5,628.78) ; IC100-2.3@2933.91,817.86 v1(2981.25,817.86) ; R1417-2.1@3639.27,1919.51 3657.05,1919.51 3657.66,1918.9 R1415-2.1@3699.21,1918.9 3703.15,1918.9 3717.74,1933.49 3730.79,1933.49 3747.55,1950.25 IC800-2.5@3765.27,1950.25 3765.27,1966.06 3762.5,1968.84 v1(3762.5,1987.5) ; TP1404-2.1@3761.71,2162.01 3761.71,2192.96 v1(3762.5,2193.75)
  Signal Layer 3 w6: v1(574.21,2362.01) 592.96,2380.76 880.46,2380.76 908,2353.22 ; v1(908,2257) 908,2353.22 ; v1(2840,2318.75) 2840,2275.7 2987.5,2128.2 2987.5,2049.68 2993.54,2043.64 2993.54,1786.04 v1(2987.5,1780) ; 3761.71,2512.01 3749.21,2524.51 1436.71,2524.51 1424.21,2512.01 1424.21,2412.01 1411.71,2399.51 1130.35,2399.51 1102.38,2371.54 1102.38,2365.18 1086.71,2349.51 911.71,2349.51 908,2353.22
  Signal Layer 3 w10: v1(2262.5,628.78) 2860.03,628.78 2943.75,712.5 2943.75,780.36 v1(2981.25,817.86) 2736.61,1062.5 2628.8,1062.5 2550,1141.3 v1(2550,1143.75) ; 3761.71,2512.01 3762.5,2511.22 v1(3762.5,2193.75) v1(3762.5,1987.5)
  Bot Copper w6: v1(521,2305) 540.51,2324.51 561.71,2324.51 574.21,2337.01 v1(574.21,2362.01)
  Bot Copper w10: v1(2550,1143.75) 2550,1360.02 2969.98,1780 v1(2987.5,1780) 3658.7,1780 3762.5,1883.8 v1(3762.5,1987.5)
SECONDARY-T-SENSOR_0: R107-2.1 R108-2.2 X202.1 | length 428.5
  Top Copper w10: R108-2.2@2975,528.69 3096.56,528.69 3146.31,478.94 R107-2.1@3146.31,475 3146.31,331.27 X202.1@3083.47,268.43
SECONDARY-T-SENSOR_1: R103-2.1 R109-2.2 X202.2 | length 374
  Top Copper w10: R109-2.2@2912.5,528.69 2916.44,528.69 2943.41,501.72 3006.29,501.72 3029.07,478.94 R103-2.1@3029.07,475 3029.07,332.02 X202.2@2965.48,268.43
SECONDARY-T-SENSOR_2: R106-2.1 R110-2.2 X202.3 | length 320.6
  Top Copper w10: X202.3@2847.49,268.43 2912.56,333.5 R106-2.1@2912.56,475 2912.56,478.94 2897.97,493.53 2889.1,493.53 2853.94,528.69 R110-2.2@2850,528.69
SECONDARY-T-SENSOR_3: R102-2.1 R111-2.2 X202.4 | length 287.5
  Top Copper w10: X202.4@2729.5,268.43 2791.34,330.28 R102-2.1@2791.34,475 2791.34,496.72 2787.5,500.56 R111-2.2@2787.5,528.69
SECONDARY-T-SENSOR_4: R105-2.1 R112-2.2 X202.5 | length 310.1
  Top Copper w10: X202.5@2611.46,268.43 2670.49,327.46 R105-2.1@2670.49,475 2670.49,478.94 2685.08,493.53 2685.9,493.53 2721.06,528.69 R112-2.2@2725,528.69
SECONDARY-T-SENSOR_5: R101-2.1 R113-2.2 X202.6 | length 366
  Top Copper w10: X202.6@2493.47,268.43 2551.77,326.73 R101-2.1@2551.77,475 2551.77,478.94 2574.55,501.72 2631.59,501.72 2658.56,528.69 R113-2.2@2662.5,528.69
SECONDARY-T-SENSOR_6: R104-2.1 R114-2.2 X202.7 | length 419.9
  Top Copper w10: X202.7@2375.48,268.43 2436.45,329.4 R104-2.1@2436.45,475 2436.45,478.94 2459.23,501.72 2551.31,501.72 2578.28,528.69 R114-2.2@2600,528.69
SECONDARY-T-SENSOR_7: R100-2.1 R115-2.2 X202.8 | length 473.8
  Top Copper w10: X202.8@2257.49,268.43 2321.21,332.15 R100-2.1@2321.21,475 2321.21,478.94 2348.52,506.25 2443.97,506.25 2453.44,515.72 2487.96,515.72 2500.93,528.69 R115-2.2@2537.5,528.69
SECONDARY-TEMP-ALERT: IC801-2.3 R801-2.1 X402.18 | length 3781.4
  Top Copper w6: v1(2887.5,2425) 2908.81,2446.31 R801-2.1@2908.81,2477.31 ; R801-2.1@2908.81,2481.25 R801-2.1@2908.81,2477.31 ; IC801-2.3@2934.74,2424.9 2934.74,2451.38 R801-2.1@2908.81,2477.31
  Signal Layer 2 w6: X402.18@350,1325 394.41,1324.41 399.21,1329.21 399.21,1499.51 411.71,1512.01 1149.21,1512.01 1161.71,1524.51 1161.71,2074.51 1174.21,2087.01 1474.21,2087.01 1486.71,2099.51 1486.71,2449.51 1499.21,2462.01 2854.24,2462.01 2887.5,2428.75 v1(2887.5,2425)
SECONDARY-WDT: IC1400-2.39 R1400-2.1 X402.16 | length 3951.2
  Top Copper w6: R1400-2.1@3171.09,2234.45 3171.09,2202.63 v1(3174.21,2199.51) 3174.21,2162.01 3186.71,2149.51 3211.71,2149.51 3225,2136.22 IC1400-2.39@3225,2088.68
  Signal Layer 3 w6: X402.16@450,1325 501,1274 973,1274 1000,1301 1000,1448 1034.52,1482.52 1050.98,1482.52 1187.38,1618.91 1187.38,2020.99 1613.21,2446.83 3120.26,2446.83 3174.21,2392.88 v1(3174.21,2199.51)
SHDN_0: R605-1.1 R609-1.1 U600-1.4 | length 458.7
  Top Copper w6: U600-1.4@4279.83,1962.47 4298.53,1962.47 4320.98,1940.03 4320.98,1862.47 4308.48,1849.97 4284.2,1849.97 4268.42,1834.18 R609-1.1@4268.42,1812.47 4286.2,1812.47 4295.98,1802.69 4295.98,1704.33 4312.81,1687.5 4340.66,1687.5 4369.94,1658.21 R605-1.1@4391.66,1658.21
SHDN_1: R605-2.1 R609-2.1 U600-2.4 | length 276.2
  Top Copper w6: R605-2.1@2156.25,1752.56 2156.25,1779.17 2166.09,1789.01 R609-2.1@2166.09,1810.73 2166.09,1832.44 2181.87,1848.23 2206.15,1848.23 2218.65,1860.73 2218.65,1938.29 2196.21,1960.73 U600-2.4@2177.51,1960.73
SW_0: C601-1.1 L600-1.1 U600-1.12 U600-1.13 U600-1.14
SW_1: C601-2.1 L600-2.1 U600-2.12 U600-2.13 U600-2.14
VBAT+: F300.1 SJ300.1 X200.8 | length 477.6
  Top Copper w24: SJ300.1@4844.21,487.01 4812.01,487.01 4787.5,462.5 4787.5,362.5 4823.18,326.82 4905.46,326.82 X200.8@4960.63,271.65
  Top Copper w32: SJ300.1@4846.65,487.01 4846.65,508.73 4854.65,508.73 4874.21,528.29 F300.1@4874.21,570.87
VBAT-: F314.1 SJ301.2 X200.1 | length 457.7
  Top Copper w32: X200.1@5797.29,268.43 5854.91,268.43 6051.77,465.29 SJ301.2@6051.77,487.01 6051.77,508.73 6043.77,508.73 6024.21,528.29 F314.1@6024.21,570.87
VCC_0: C606-1.1 U600-1.10 | length 81.5
  Top Copper w16: U600-1.10@4512.12,1936.88 4563.67,1936.88 4582.04,1918.51 C606-1.1@4585.98,1918.51
VCC_1: C606-2.1 U600-2.10 | length 81.5
  Top Copper w16: U600-2.10@2409.79,1935.14 2461.35,1935.14 2479.71,1916.77 C606-2.1@2483.65,1916.77
VIN_0: C602-1.2 C603-1.2 Q600-1.3 Q600-1.8 R601-1.1 R603-1.2 U600-1.3 | length 321.5
  Top Copper w16: C602-1.2@4093.75,1942.07 4093.75,1789.73 4120.98,1762.5 4200.78,1762.5 4211.91,1751.37 R601-1.1@4211.91,1716.21
VIN_1: C602-2.2 C603-2.1 Q600-2.3 Q600-2.8 R601-2.1 R603-2.2 U600-2.3 | length 139.8
  Top Copper w16: R601-2.1@1971.31,1810.73 1971.31,1862.19 1981.15,1872.04 C602-2.2@1981.15,1946.46
pads on no net: Designator12.0 Designator13.0 Designator26.Hole_3.2 Designator27.Hole_3.2 Designator28-1.Hole_3.2 Designator29.Hole_3.2 IC800-1.1 IC800-1.2 IC800-2.1 IC800-2.2 IC1400-1.43 IC1400-1.44 IC1400-2.3 IC1400-2.5 IC1400-2.7 IC1400-2.9 IC1400-2.11 IC1400-2.13 IC1400-2.15 IC1400-2.17 IC1400-2.19 IC1400-2.21 IC1400-2.23 IC1400-2.25 IC1400-2.43 IC1400-2.44 TR1400-1.2 TR1400-1.5 TR1400-2.2 TR1400-2.5 U700-1.13 U700-2.13 X200. X200.9 X200.10 X200.11 X200.12 X200.20 X200.21 X200.22 X200.23 X200.24 X201. X202. X500. X501. X502. X503. X1001. X1002.
copper on no net: | length 61.1
  VREG w10: 3670,1825 3673.72,1825 3674.21,1824.51 ; 3670,1950 3723.72,1950 3724.21,1949.51 ; 5772.14,1825 5773.72,1825 5774.21,1824.51

## Polygon pours and split planes (outlines as drawn)
no net on Top Overlay "Polygon_28_NoNet" (solid): 61 vertices, not listed, extent 1377.23,2352.82 1464.96,2503.11
no net on Top Overlay "Polygon_27_NoNet" (solid): 60 vertices, not listed, extent 1454.88,2383.2 1534.47,2470.88
no net on Top Overlay "Polygon_26_NoNet" (solid): 53 vertices, not listed, extent 1534.14,2383.36 1621.93,2470.89
no net on Top Overlay "Polygon_25_NoNet" (solid): 69 vertices, not listed, extent 1655.17,2384.31 1725.24,2483.2
no net on Top Overlay "Polygon_24_NoNet" (solid): 33 vertices, not listed, extent 1745.53,2383.73 1832.92,2483.77
no net on Top Overlay "Polygon_23_NoNet" (solid): 75 vertices, not listed, extent 1852.77,2383.48 1921.57,2484.03
no net on Top Overlay "Polygon_22_NoNet" (solid): 105 vertices, not listed, extent 1327.42,2324.61 2002.39,2542.57
no net on Top Overlay "Polygon_10_NoNet" (solid, pour order 1): 33 vertices, not listed, extent 73.49,646.27 94.43,667.08
no net on Top Overlay "Polygon_9_NoNet" (solid, pour order 6): 17 vertices, not listed, extent 97.24,637 166.43,676.35
no net on Top Overlay "Polygon_8_NoNet" (solid, pour order 16): 133 vertices, not listed, extent 48.3,585.06 191.57,728.28
no net on Top Overlay "Polygon_7_NoNet" (solid, pour order 0): 33 vertices, not listed, extent 73.49,646.27 94.43,667.08
no net on Top Overlay "Polygon_6_NoNet" (solid, pour order 7): 17 vertices, not listed, extent 97.24,637 166.43,676.35
no net on Top Overlay "Polygon_5_NoNet" (solid, pour order 15): 133 vertices, not listed, extent 48.3,585.06 191.57,728.28
no net on Top Overlay "Polygon_4_NoNet" (solid, pour order 2): 59 vertices, not listed, extent 97.37,492.21 142.57,533.3
no net on Top Overlay "Polygon_3_NoNet" (solid, pour order 3): 58 vertices, not listed, extent 97.37,451.07 142.57,492.15
no net on Top Overlay "Polygon_2_NoNet" (solid, pour order 14): 132 vertices, not listed, extent 48.31,420.47 191.58,563.69
no net on Top Overlay "Polygon_1_NoNet" (solid, pour order 125): 6254.21,2856.51 5968.21,2856.51 5968.21,3550.51 6254.21,3550.51
no net on Bottom Overlay "Polygon_31_NoNet" (solid, pour order 22): 6136.55,2298.17 5966.45,2298.17 5966.4,2333.09 6040.39,2333.09 6040.49,2390.26 6068.19,2390.26 6068.24,2333.09 6108.7,2333.17 6108.76,2393.12 6136.51,2393.07
no net on Bottom Overlay "Polygon_30_NoNet" (solid, pour order 13): 23 vertices, not listed, extent 5966.36,2414.97 6095.42,2489.33
no net on Bottom Overlay "Polygon_29_NoNet" (solid, pour order 9): 32 vertices, not listed, extent 5963.58,2497.55 6043.39,2555.36
no net on Bottom Overlay "Polygon_28_NoNet" (solid, pour order 17): 49 vertices, not listed, extent 5964.51,2510.94 6095.21,2611.03
no net on Bottom Overlay "Polygon_27_NoNet" (solid, pour order 23): 41 vertices, not listed, extent 5963.63,2634.66 6092.45,2750.16
no net on Bottom Overlay "Polygon_26_NoNet" (solid, pour order 24): 44 vertices, not listed, extent 5966.35,2782.31 6095.27,2897.45
no net on Bottom Overlay "Polygon_25_NoNet" (solid, pour order 28): 43 vertices, not listed, extent 5966.4,2929.45 6148.84,3044.86
no net on Bottom Overlay "Polygon_24_NoNet" (solid, pour order 27): 75 vertices, not listed, extent 5963.61,3063.89 6095.54,3195.48
no net on Bottom Overlay "Polygon_23_NoNet" (solid, pour order 21): 35 vertices, not listed, extent 5966.3,3202.25 6151.83,3290.62
no net on Bottom Overlay "Polygon_22_NoNet" (solid, pour order 25): 68 vertices, not listed, extent 5963.38,3298.79 6094.66,3416.6
no net on Bottom Overlay "Polygon_21_NoNet" (solid, pour order 18): 25 vertices, not listed, extent 5963.03,3434.8 6098.92,3517.02
no net on Bottom Overlay "Polygon_20_NoNet" (solid, pour order 5): 5881.74,3310.39 5881.74,3328.35 5796.07,3328.3 5796.12,3310.34
no net on Bottom Overlay "Polygon_19_NoNet" (solid, pour order 4): 5881.74,3348.98 5881.74,3366.3 5796.07,3366.3 5796.17,3349.03
no net on Bottom Overlay "Polygon_18_NoNet" (solid, pour order 8): 60 vertices, not listed, extent 5794.7,3383.92 5883.16,3438.01
no net on Bottom Overlay "Polygon_17_NoNet" (solid, pour order 10): 56 vertices, not listed, extent 5796.11,3454.28 5881.95,3513.33
no net on Bottom Overlay "Polygon_16_NoNet" (solid, pour order 29): 6220.6,1962.32 6149.43,1962.71 6150.64,1985.47 6153.99,2019.12 6160.11,2062.01 6164.64,2086.02 6170.35,2111.41 6179.62,2145.84 6189.28,2175.56 6199.93,2203.31 6204.99,2215.03 6220.79,2215.03
no net on Bottom Overlay "Polygon_15_NoNet" (solid, pour order 12): 35 vertices, not listed, extent 6106.99,1962.42 6199.89,2214.93
no net on Bottom Overlay "Polygon_14_NoNet" (solid, pour order 19): 35 vertices, not listed, extent 6039.77,1962.62 6176.6,2214.83